# Altium PCB OpenRex_V1I1_PCB.PcbDoc (part 9 of 12)
Units mm, origin at the board's own origin, x right, y up, seen from the top; angles counter-clockwise.
Board outline 70 x 95 mm, 10 copper layers (L1, L2, L3, L4 (PWR), L5 (PWR), L6 (PWR), L7 (PWR), L8, L9, L10), stack 1.632 mm thick; 1080 components, 708 nets, 3831 pads, 2373 vias.
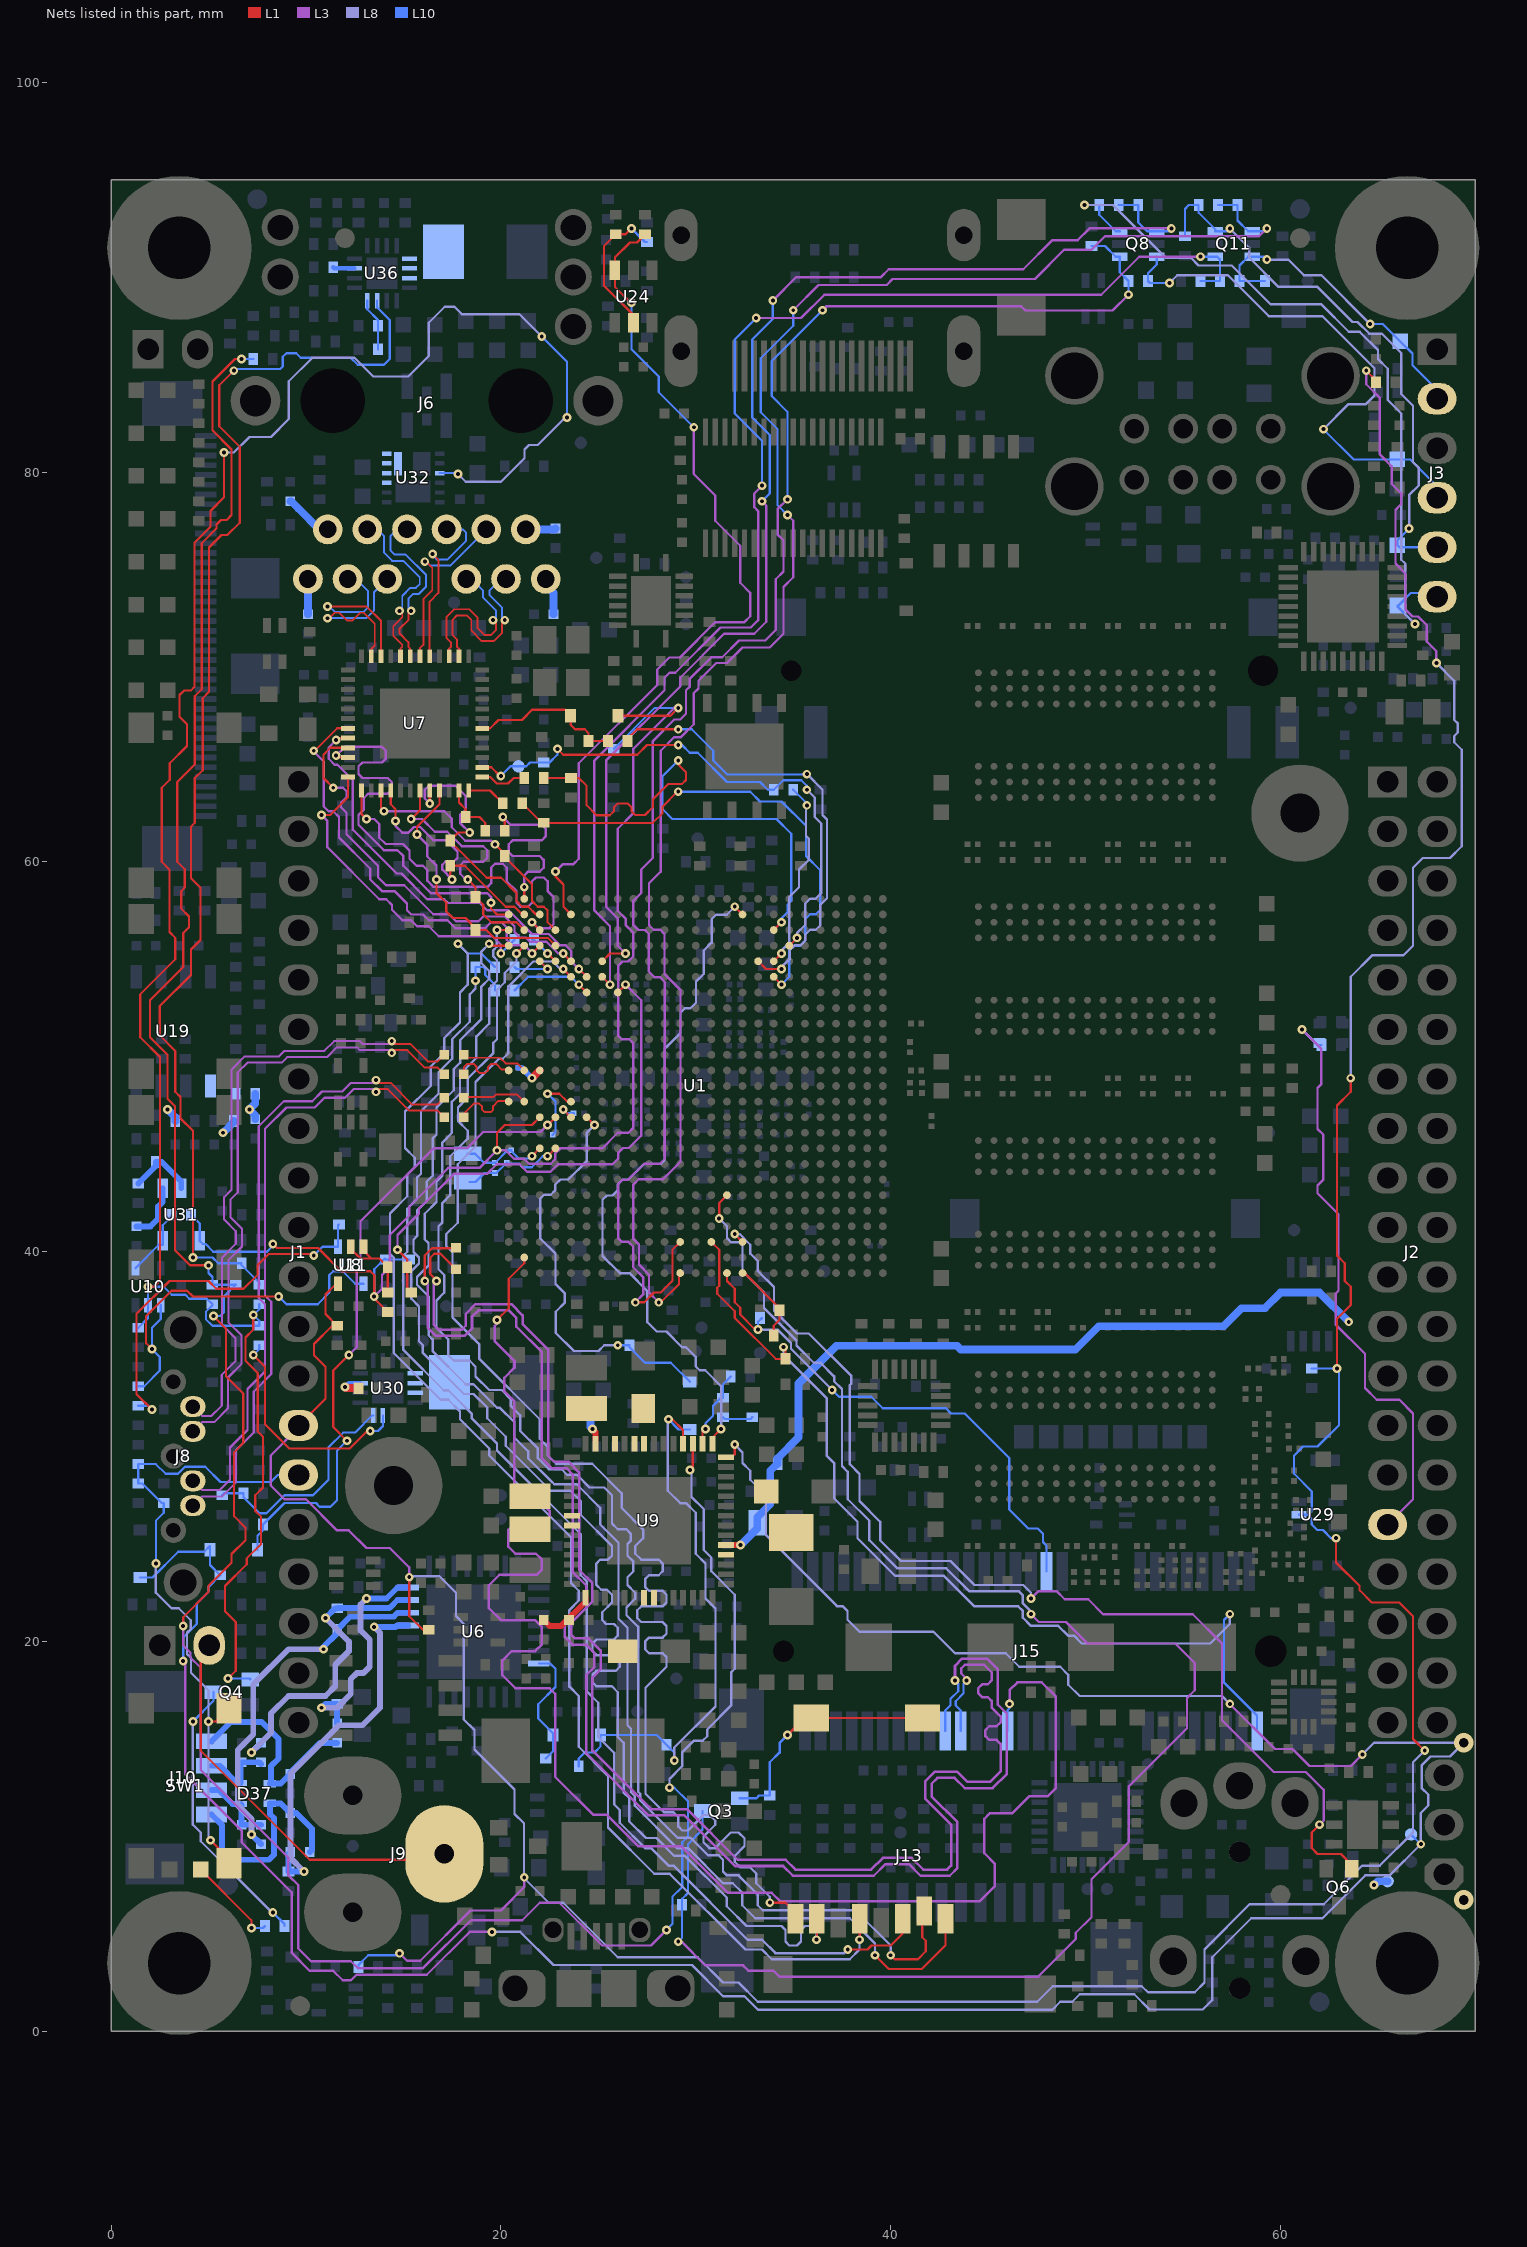
[diagram p17: the nets of this part, all layers, seen from the top]

## Via types
v1: diameter 0.45, hole 0.2, L1 to L10, tented both sides, 2369 vias
v2: diameter 1, hole 0.5, L1 to L10, tented top, 4 vias

## Nets (pads, with @x,y where several pads share a name; then routed paths per layer and width w, separated by ;. In a path a pad name is that pad's centre, name@x,y a point inside that pad or via, vN(x,y) a via of type N, cw(c..) or ccw(c..) an arc to the next point about the centre after c; other vN are vias at no path point) (continued)
PCIE_RX_P: J15.25 U1.B2 | length 83.6
  L1 w0.114: v1(19.8,36.5) 20.4,37.1 20.4,38.605 21.2,39.405 U1.B2@21.2,39.7
  L3 w0.13: v1(19.8,36.5) 19.8,36.3 19.679,36.179 19.679,35.421 20.7,34.4 20.7,34.053 20.18,33.533 20.18,32.82 20.69,32.31 20.69,27.802 21.192,27.3 21.9,27.3 22.5,26.7 22.5,26.4 22.32,26.22 20.867,26.22 20.38,25.733 20.38,24.867 20.747,24.5 21.8,24.5 22.1,24.2 22.1,23.7 21.82,23.42 19.917,23.42 19.38,22.883 19.38,21.717 19.997,21.1 21.747,21.1 22.1,20.747 22.1,19.853 21.757,19.51 20.557,19.51 20.08,19.033 20.08,18.267 20.747,17.6 22.5,17.6 22.79,17.31 22.79,13.057 24.747,11.1 25.447,11.1 27.047,9.5 29.247,9.5 31.647,7.1 33.9,7.1 34.32,6.68 44.58,6.68 45.35,7.45 45.35,8.59 44.8,9.14 44.8,10.9 45.08,11.18 46.233,11.18 47.1,12.047 48.047,12.047 48.476,12.476 48.476,17.177 47.753,17.9 46.5,17.9 46.1,17.5 v1(46.1,16.8)
  L10 w0.114: J15.25@46,15.4 46,16.49 46.1,16.59 v1(46.1,16.8)
PCIE_TX_N: C63.2 J15.31 | length 80.7
  L1 w0.114: v1(16.7,38.5) 16.7,38.525 16.374,38.851 16.374,39.687 16.583,39.896 16.904,39.896 C63.2@17.7,39.1
  L3 w0.13: v1(16.7,38.5) 16.56,38.36 16.56,36.24 16.8,36 18,36 18.2,36.2 18.2,36.8 18.71,37.31 20.543,37.31 21.12,36.733 21.12,36.28 22.42,34.98 22.42,29.528 22.738,29.21 23.49,29.21 24.02,28.68 24.02,23.68 24.7,23 24.7,22.047 23.6,20.947 23.6,20.36 23.8,20.16 24.503,20.16 25.12,19.543 25.12,18.567 24.7,18.147 24.7,14.4 27.7,11.4 29.553,11.4 32.153,8.8 34.613,8.8 35.113,8.3 39,8.3 39.6,8.9 41.072,8.9 41.672,8.3 42.9,8.3 43.1,8.5 43.1,10.6 41.78,11.92 41.78,12.833 42.267,13.32 43.413,13.32 43.933,12.8 45.1,12.8 45.64,13.34 45.64,14.75 45.44,14.95 45.057,14.95 44.857,15.15 44.857,15.45 45.057,15.65 45.44,15.65 45.64,15.85 45.64,16.16 45.18,16.62 45.18,16.95 44.98,17.15 44.69,17.15 44.49,17.35 44.49,17.6 44.69,17.8 44.98,17.8 45.18,18 45.18,18.42 44.8,18.8 43.8,18.8 43.62,18.62 43.62,18.359 43.9,18.079 v1(43.9,18)
  L10 w0.114: J15.31@43.6,15.4 43.6,16.457 43.337,16.72 43.337,16.937 43.737,17.337 43.737,17.837 v1(43.9,18)
PCIE_TX_P: C65.2 J15.33 | length 80.7
  L1 w0.114: v1(16.1,38.5) 16.1,39.8 16.47,40.17 17.67,40.17 C65.2@17.7,40.2
  L3 w0.13: v1(16.1,38.5) 16.24,38.36 16.24,36.107 16.667,35.68 18.133,35.68 18.52,36.067 18.52,36.667 18.843,36.99 20.41,36.99 20.8,36.6 20.8,36.147 22.1,34.847 22.1,29.396 22.606,28.89 23.357,28.89 23.7,28.547 23.7,23.547 24.38,22.867 24.38,22.18 23.28,21.08 23.28,20.227 23.667,19.84 24.37,19.84 24.8,19.41 24.8,18.7 24.38,18.28 24.38,14.267 27.567,11.08 29.42,11.08 32.02,8.48 34.48,8.48 34.98,7.98 39.133,7.98 39.733,8.58 40.939,8.58 41.539,7.98 43.033,7.98 43.42,8.367 43.42,10.733 42.1,12.053 42.1,12.7 42.4,13 43.281,13 43.801,12.48 45.233,12.48 45.96,13.207 45.96,16.293 45.5,16.753 45.5,18.553 44.933,19.12 43.667,19.12 43.3,18.753 v1(43.3,18)
  L10 w0.114: J15.33@42.8,15.4 42.8,16.457 43.063,16.72 43.063,17.05 43.463,17.45 43.463,17.837 v1(43.3,18)
PCIE_WAKE: J15.1 R197.1 U1.P3 | length 49.2
  L1 w0.114: U1.P3@30.8,40.5 31.2,40.1 31.2,38.244 31.1,38.144 31.1,37.844 32,36.944 32,36.6 34.1,34.5 R197.1@34.6,34.5 34.6,35 v1(34.5,35.1)
  L8 w0.12: v1(34.5,35.1) 34.5,34.7 36.715,32.485 36.715,29.541 37.1,29.156 37.1,27.344 38.3,26.144 38.3,25.3 40.234,23.366 42.734,23.366 44.3,21.8 46.544,21.8 46.785,21.559 46.785,21.215 47.2,20.8 48.6,20.8 49.1,20.3 49.4,20.3 49.8,19.9 56.4,19.9 57.4,20.9 v1(57.4,21.4)
  L10 w0.114: v1(57.4,21.4) 57.1,21.1 57.1,17.9 58.8,16.2 J15.1@58.8,15.4
PCIE_WDISN: J15.20 R116.1 U1.R1 | length 27
  L1 w0.114: U1.R1@31.6,38.9 31.6,38.5 32,38.1 32,37.4 32.28,37.12 32.28,36.776 33.056,36 v1(33.2,36)
  L8 w0.12: v1(33.2,36) 34.2,36 34.885,35.315 34.885,35.015 v1(37,32.9)
  L10 w0.114: v1(33.2,36) 33.2,36.4 R116.1@33.4,36.6 ; v1(37,32.9) 37.344,32.556 39,32.556 39.591,31.965 42.835,31.965 43.1,31.7 43.8,31.7 46.085,29.415 46.085,26.77 47.056,25.8 47.544,25.8 47.815,25.529 47.815,25.1 48,24.915 J15.20@48,23.6
PHASE_1V375: L12.1 U30.13 U30.14 U30.15
PHASE_3V3_HDR: L13.1 U36.13 U36.14 U36.15
PMIC_INT: R236.2 R263.1 U1.T24 U9.1 | length 37.8
  L1 w0.114: U9.1@30.85,30.15 30.85,30.45 v1(31.3,30.9) ; v1(32,57.7) U1.T24@32.4,57.3
  L8 w0.12: v1@31.3,31.1 31.3,33.1 30.485,33.915 30.2,33.915 30,34.115 30,34.6 29.5,35.1 29.3,35.1 28.5,35.9 28,35.9 27.515,36.385 27.515,37.985 26.6,38.9 26.1,38.9 25.215,39.785 25.215,42.659 25.441,42.885 25.729,42.885 25.985,43.141 25.985,43.429 26.241,43.685 26.529,43.685 27.344,44.5 28.2,44.5 28.4,44.7 28.4,50.4 29.215,51.215 29.215,52.259 29.441,52.485 29.729,52.485 30.015,52.771 30.015,53.859 30.408,54.252 30.408,55.448 30.815,55.855 30.815,56.7 30.815,57.059 31.041,57.285 31.585,57.285 v1(32,57.7)
  L10 w0.114: v1(31.3,30.9) 31.3,31.4 R236.2@31.4,31.5 31.485,31.415 32.815,31.415 R263.1@32.9,31.5
PMIC_ON_REQ: D29.1 R73.1 U1.D11 | length 33.5
  L1 w0.114: v1(12.1,30.3) 11.4,31 11.4,33.9 v1(12.2,34.7) ; v1(22.4,46.5) U1.D11@22.8,46.9
  L3 w0.12: v1(12.2,34.7) 12.6,35.1 12.6,39 12.8,39.2 12.8,41.556 16.544,45.3 18.256,45.3 19.096,46.14 22.04,46.14 v1(22.4,46.5)
  L10 w0.114: D29.1@7.519,24.7 7.519,25.419 7.8,25.7 R73.1@7.8,26 8.9,27.1 10.515,27.1 10.7,26.915 11.259,26.915 11.6,27.256 11.6,29.8 v1(12.1,30.3)
PMIC_SDWNB: R236.1 R264.1 U9.2 | length 4.1
  L1 w0.114: U9.2@30.35,30.15 30.35,30.75 v1(30.5,30.9)
  L10 w0.114: v1(30.5,30.9) 30.5,31.2 30.885,31.585 30.885,32.085 31.3,32.5 R236.1@31.4,32.5 31.4,33.2 R264.1@31.8,33.6
PMIC_STBY_REQ: D28.2 D36.2 R237.2 R385.1 U9.4 | length 29.5
  L1 w0.114: v1(28.6,31.4) 28.8,31.4 29.35,30.85 U9.4@29.35,30.15
  L8 w0.12: v1(28.6,31.4) 28.565,31.365 28.565,27.735 29.2,27.1 29.5,27.1 30,26.6 30,24.5 30.5,24 30.5,22.2 31.015,21.685 31.015,16.671 28.9,14.556 v1(28.9,13.9)
  L10 w0.114: R237.2@24,13.6 24,14 24.3,14.3 24.8,14.3 25.119,14.619 D36.2@25.119,15.2 28,15.2 R385.1@28.5,14.7 28.9,14.3 v1(28.9,13.9) ; v1(28.6,31.4) 29.119,30.881 D28.2@29.7,30.881
PMIC_STBY_REQ_CPU: D28.1 R266.1 U1.F11 | length 21.8
  L1 w0.114: U1.F11@24.4,46.9 v1(24.8,46.5)
  L8 w0.12: v1(24.8,46.5) 24.415,46.115 24.415,44.655 23.46,43.7 23.056,43.7 22.785,43.429 22.785,43.141 22.559,42.915 22.211,42.915 22.015,42.719 22.015,40.685 22.8,39.9 22.8,38.344 23.285,37.859 23.285,37.385 22.815,36.915 22.815,35.83 23.745,34.9 25.004,34.9 25.304,35.2 v1(26,35.2)
  L10 w0.114: v1(26,35.2) R266.1@26.6,35.2 26.6,35.1 27.4,34.3 28.719,34.3 D28.1@29.7,33.319
PMIC_VDDOTP: C376.1 R261.1 R265.2 TP17.1 U9.47 | length 42.1
  L1 w0.3: U9.47@31.55,24.95 v1(32.3,24.95)
  L1 w0.4: v2@69.35,6.75 v2@69.4,6.7
  L10 w0.4: v1(32.3,24.95) 33.15,25.8 33.15,26.366 33.82,27.036 33.82,28.76 R265.2@34.2,29.14 ; R265.2@34.2,29.1 R265.2@34.2,29.14 ; v1(63.5,36.4) 62,37.9 60,37.9 59.2,37.1 58,37.1 57.075,36.175 50.675,36.175 49.475,34.975 43.6,34.975 43.4,35.175 37.217,35.175 35.275,33.233 35.275,30.475 34.2,29.4 R265.2@34.2,29.14 ; v1(64.8,7.5) 65,7.7 TP17.1@65.5,7.7
  other v2: 69.4,6.74
PMIC_VHALF: C340.2 C342.1 U9.29 | length 3
  L1 w0.3: C342.1@22.2,21.1 22.5,20.8 23.1,20.8 24.35,22.05 U9.29@24.35,22.25
POK_1V375_OPT: R351.1 U30.3 | length 12
  L1 w0.114: v1(7.3,34.7) 7.9,34.1 7.9,31.144 9.144,29.9 12.244,29.9 13.144,30.8 v1(13.3,30.8)
  L10 w0.114: v1(7.3,34.7) 7.6,35 R351.1@7.6,35.2 ; v1(13.3,30.8) 13.7,30.8 13.95,31.05 U30.3@13.95,31.59
POK_3V3_OPT: R333.1 R405.1 U36.3 | length 65.6
  L1 w0.114: v1(4.2,39.7) 4.2,46.2 3.565,46.835 3.565,47.935 3.3,48.2 3.3,50.3 2.5,51.1 2.5,52.6 4.1,54.2 4.1,55.5 4.585,55.985 4.585,58.675 4.1,59.16 4.1,61.8 4.3,62 4.3,64.3 4.7,64.7 4.7,68.396 5.028,68.724 5.028,76.13 5.663,76.765 5.965,76.765 6.6,77.4 6.6,81.3 5.55,82.35 5.55,84.45 v1(6.3,85.2)
  L10 w0.114: v1(4.2,39.7) 5.2,39.7 5.5,39.4 R405.1@6.7,39.4 6.7,39.3 7.6,38.4 R333.1@7.6,38.3 ; v1(6.3,85.2) 6.385,85.285 8.685,85.285 8.815,85.415 8.815,85.915 9,86.1 9.5,86.1 9.733,85.867 12.289,85.867 12.656,85.5 14,85.5 14.3,85.8 14.3,87.8 13.65,88.45 U36.3@13.65,88.8
POK_PMIC: R177.1 R229.1 R404.2 U9.3 | length 145.1
  L1 w0.114: v1(3.7,20.8) 3.7,21.244 5,22.544 5,22.856 6.185,24.041 6.185,24.485 6.9,25.2 6.9,25.84 6.315,26.425 6.315,29.715 6.785,30.185 6.785,32.719 5.9,33.604 5.9,36.05 v1(5.25,36.7) ; v1(5,39.3) 4.056,39.3 3.285,40.071 3.285,47.459 2.9,47.844 2.9,50.1 2,51 2,52.9 3.7,54.6 3.7,56.344 4,56.644 4,57.2 3.6,57.6 3.6,58.494 3.785,58.679 3.785,59.615 3.4,60 3.4,64.1 4.3,65 4.3,68.5 4.657,68.857 4.657,76.351 5.415,77.109 5.415,77.309 5.641,77.535 5.929,77.535 6.185,77.791 6.185,81.159 5.2,82.144 5.2,84.644 6.356,85.8 v1(6.7,85.8) ; v1(29.7,28.8) 29.85,28.95 U9.3@29.85,30.15
  L3 w0.12: v1(3.7,20.8) 3.7,19.8 4.08,19.42 4.08,19.169 4.6,18.649 4.6,13.4 9.1,8.9 9.1,8 9.6,7.5 9.6,4.256 10.262,3.594 12.3,3.594 12.654,3.24 16.008,3.24 18.468,5.7 21.1,5.7 22,6.6 23,6.6 25.2,4.4 27.7,4.4 v1(28.5,5.2)
  L8 w0.12: v1(28.65,12.5) 28.65,12.95 29.3,13.6 29.3,14.3 29.915,14.915 30.359,14.915 30.585,15.141 30.585,15.485 31.815,16.715 31.815,18.415 32,18.6 32,22.4 30.8,23.6 30.8,24.3 30.406,24.694 30.406,26.794 29.785,27.415 29.785,28.715 v1(29.7,28.8)
  L10 w0.114: v1(5,39.3) 5,38.9 5.2,38.7 R177.1@5.2,38.3 R229.1@6.4,38.3 5.8,37.7 5.8,36.9 5.6,36.7 v1(5.25,36.7) ; v1(6.7,85.8) R404.2@7.3,85.8 ; v1(28.5,5.2) 28.8,5.5 28.8,6.9 29.304,7.404 29.304,9.7 29.6,9.996 29.6,11.8 28.9,12.5 v1(28.65,12.5)
POK_SYS: Q4.1 R177.2 R272.1 R333.2 R351.2 U10.2 U32.9 | length 115.5
  L1 w0.114: v1(1.9,38.2) 2.2,38.2 2.51,38.51 2.51,49.99 1.5,51 1.5,53.2 3.3,55 3.3,56.1 3,56.4 3,59.6 2.6,60 2.6,63.8 3.015,64.215 3.015,65.059 3.9,65.944 3.9,67.056 3.515,67.441 3.515,68.559 3.741,68.785 4.085,68.785 4.285,68.985 4.285,76.375 5.1,77.19 5.1,78 5.8,78.7 v1(5.8,81) ; v1(6,18.1) 6.4,18.5 6.4,21 5.85,21.55 5.85,22.85 6.96,23.96 6.96,24.264 7.7,25.004 7.7,26.4 7.4,26.7 7.4,27.5 7.8,27.9 7.8,30.5 7.528,30.772 7.528,33.772 6.9,34.4 6.9,35.6 7.3,36 v1(7.3,36.75)
  L8 w0.12: v1(5.8,81) 6.3,81 7.1,81.8 8.2,81.8 9.122,82.722 9.122,84.657 10.332,85.867 12.489,85.867 13.456,84.9 15.244,84.9 16.3,85.956 16.3,87.66 17.125,88.485 17.615,88.485 18,88.1 20.95,88.1 v1(22.1,86.95) ; v1(17.8,79.9) 18.2,79.5 20.008,79.5 21.215,80.707 21.215,81.159 21.441,81.385 21.893,81.385 23.308,82.8 v1(23.4,82.8)
  L10 w0.114: R272.1@1.4,36.1 1.9,36.6 U10.2@1.9,37.25 v1(1.9,38.2) 2.7,38.2 3.115,37.785 3.815,37.785 4.015,37.585 4.915,37.585 R177.2@5.2,37.3 5.2,37.256 4.865,36.921 4.865,36.535 5.2,36.2 R351.2@7.6,36.2 7.6,36.45 v1(7.3,36.75) 7.6,37.05 R333.2@7.6,37.3 ; v1(6,18.1) 7.1,18.1 Q4.1@7.15,18.05 ; U32.9@16.86,79.95 17.75,79.95 v1(17.8,79.9) ; v1(22.1,86.95) 23.4,85.65 v1(23.4,82.8)
POR_BN: D10.1 R70.1 R158.1 R178.2 R225.1 R350.1 U1.C11 U31.1 | length 71.7
  L1 w0.114: v1(8.3,40.4) 8.515,40.185 10.615,40.185 11.8,39 13.3,39 13.5,38.8 v1(13.5,37.7) 13.5,37.6 R70.1@14.2,36.9 ; v1(19.8,45.2) 19.8,46.1 20.2,46.5 21.6,46.5 U1.C11@22,46.9 ; D10.1@25.919,67.5 D10.1@25.969,67.55 ; D10.1@26.019,67.5 28.7,67.5 v1(29.1,67.9)
  L3 w0.12: v1(13.5,37.7) 13.9,38.1 13.9,38.8 14.3,39.2 14.3,40.856 15.3,41.856 15.3,42.3 17.3,44.3 18.9,44.3 v1(19.8,45.2) 20.244,45.2 20.679,44.765 21.191,44.765 21.441,44.515 22.559,44.515 22.785,44.741 22.785,45.029 23.056,45.3 25.2,45.3 26,46.1 26.544,46.1 26.785,46.341 26.785,50.7 26.585,50.9 26.2,50.9 26.015,51.085 26.015,54.659 26.241,54.885 26.529,54.885 26.8,55.156 26.8,56.36 26.4,56.76 26.4,57.096 26,57.496 26,61.7 26.8,62.5 26.8,65.8 28.9,67.9 v1(29.1,67.9)
  L10 w0.114: R350.1@4.1,41.9 4.55,41.45 U31.1@4.55,40.55 4.7,40.4 4.844,40.4 5.244,40 8,40 8.3,40.3 v1(8.3,40.4) ; v1(13.5,37.7) 13.5,39.1 R158.1@14.05,39.65 ; R158.1@14.1,39.6 R225.1@15.3,39.6 ; R178.2@25.8,65.8 27.9,67.9 v1(29.1,67.9)
POR_CT: C413.1 U31.4 | length 2.9
  L10 w0.3: C413.1@1.3,41.3 2.021,41.3 2.41,41.689 2.41,42.31 2.65,42.55 U31.4@2.65,43.25
POR_R_BN: R350.2 U10.4 U31.3 | length 3.6
  L10 w0.114: U10.4@1.25,39.15 2.45,40.35 2.65,40.35 U31.3@2.65,40.55 2.65,41.35 3.1,41.8 R350.2@3.1,41.9
PWM2_OUT_R: J2.31 R367.2 R369.2 | length 30.8
  L3 w0.12: v1(61.1,51.4) 62.1,50.4 62.1,48.6 61.9,48.4 61.9,46.3 62.2,46 62.2,43.7 61.9,43.4 61.9,43 62.98,41.92 62.98,37.995 62.83,37.845 62.83,36.27 64.34,34.76 64.34,33 64.94,32.4 66.1,32.4 66.8,31.7 66.8,27.3 J2.31@65.5,26
  L10 w0.114: v1(61.1,51.4) 61.9,50.6 R367.2@62.1,50.6
PWR_LED_GRN_D: D22.1 R379.1 | length 4.8
  L1 w0.114: D22.1@4.6,8.3 7.2,5.7 v1(7.2,5.3)
  L10 w0.114: v1(7.2,5.3) 7.8,5.3 R379.1@7.9,5.4
PWR_LED_GRN_Q: Q4.3 R379.2 | length 14.4
  L8 w0.12: v1(4.2,15.9) 4.2,10.6 4.6,10.2 4.6,9.756 8.256,6.1 v1(8.3,6.1)
  L10 w0.114: v1(4.2,15.9) 5.25,16.95 Q4.3@5.25,17.4 ; v1(8.3,6.1) 8.9,5.5 R379.2@8.9,5.4
PWR_SEL: J9.3 JP1.2 | length 20.5
  L1 w0.114: JP1.2@5.04,19.78 5.04,19.6 4.6,19.16 4.6,14.4 10.2,8.8 16.1,8.8 16.4,9.1 J9.3@17.1,9.1
PWRON: D29.2 D39.2 R262.1 TP6.1 U9.56 | length 150.9
  L1 w0.114: U9.56@31.55,29.45 31.85,29.45 32,29.6 v1(32,30.1)
  L3 w0.12: v1(3.7,19) 3.8,18.9 3.8,13.2 6.7,10.3 6.7,9.7 9.265,7.135 9.265,4.035 10.2,3.1 11.4,3.1 11.885,2.615 12.315,2.615 12.6,2.9 16.2,2.9 18.4,5.1 v1(19.55,5.1) ; v1(57.4,16.8) 59.715,14.485 60.615,14.485 61.485,13.615 63.615,13.615 v1(64.2,14.2)
  L8 w0.12: v1(19.55,5.1) 21,5.1 22.7,3.4 29.8,3.4 31.398,1.802 32.502,1.802 33.204,1.1 48.285,1.1 48.7,1.515 49.315,1.515 49.7,1.9 52.5,1.9 53.285,1.115 56.015,1.115 56.5,1.6 56.5,3.8 58.5,5.8 62.15,5.8 64.35,8 65.6,8 v1(67.2,9.6) 67.2,11.2 67.585,11.585 67.585,12.144 67.24,12.489 67.24,13.64 67.7,14.1 68.7,14.1 v2(69.4,14.8) 64.8,14.8 v1(64.2,14.2) ; v1(32,30.1) 32.4,29.7 32.4,29.156 32.8,28.756 32.8,28.3 33.6,27.5 33.6,25.456 37.241,21.815 37.529,21.815 37.785,21.559 37.785,21.115 38.4,20.5 42.2,20.5 43.3,19.4 45.9,19.4 46.6,18.7 48.7,18.7 49.115,18.285 49.115,17.785 49.7,17.2 57,17.2 v1(57.4,16.8)
  L10 w0.114: D39.2@1.5,23.281 2.125,23.281 3.444,24.6 4.781,24.6 5.081,24.9 D29.2@5.081,24.7 5.081,23.919 R262.1@5.6,23.4 5,22.8 5,22.544 4.4,21.944 4.4,20.9 3.7,20.2 v1(3.7,19) ; TP6.1@66.7,10.1 v1(67.2,9.6)
RGMII_INT: R88.2 R89.1 TP27.1 U1.W22 U7.38 | length 28.6
  L1 w0.114: U7.38@19.04,64.85 19.506,64.85 19.956,64.4 v1(20,64.4) ; v1(22.9,65.8) 23.2,65.5 27,65.5 27.5,66 v1(29.1,66) ; U1.W22@34.8,55.7 v1(35.2,56.1)
  L8 w0.12: v1(35.2,56.1) 35.2,56.356 35.615,56.771 35.615,57.2 35.615,57.859 35.871,58.115 36.159,58.115 36.44,58.396 36.44,61.96 36.1,62.3 36.1,63.3 v1(35.7,63.7)
  L10 w0.114: v1(20,64.4) 20.5,64.9 TP27.1@20.9,64.9 21.3,64.9 21.5,65.1 R89.1@22.2,65.1 22.5,65.1 22.9,65.5 v1(22.9,65.8) ; v1(29.1,66) 29.296,66 29.696,65.6 30.1,65.6 31.6,64.1 33.3,64.1 33.7,63.7 R88.2@34,63.7 34.49,64.19 35.41,64.19 35.7,63.9 v1(35.7,63.7)
RGMII_INT_R: R88.1 U1.V21 | length 9.9
  L1 w0.114: U1.V21@34,54.9 v1(34.4,55.3)
  L8 w0.12: v1(34.4,55.3) 34.4,55.455 34.8,55.855 34.8,58.2 35.3,58.7 35.3,59.6 35.8,60.1 35.8,61.194 35.653,61.341 35.653,62.853 v1(35.7,62.9)
  L10 w0.114: R88.1@35,63.7 35.7,63 v1(35.7,62.9)
RGMII_MDC: R85.1 R87.1 U1.V20 | length 26.7
  L1 w0.114: R85.1@21.1,63 22.1,62 R87.1@22.2,62 27.8,62 28.3,62.5 28.3,62.844 29.056,63.6 v1(29.1,63.6) ; U1.V20@34,54.1 v1(34.4,53.7)
  L10 w0.114: v1(29.1,63.6) 32.8,63.6 33.3,63.1 34.4,63.1 35.653,61.847 35.653,60.302 36.385,59.571 36.385,57.541 36.159,57.315 35.871,57.315 35.615,57.059 35.615,55.971 35.329,55.685 35.041,55.685 34.8,55.444 34.8,54.1 v1(34.4,53.7)
RGMII_MDIO: R86.1 R162.1 U1.V23 | length 26.8
  L1 w0.114: R86.1@22.2,64.3 R162.1@23.6,64.3 24,64.3 24.4,63.9 24.4,62.9 24.91,62.39 25.59,62.39 25.8,62.6 25.8,62.8 26,63 26.5,63 26.7,62.8 26.7,62.6 26.9,62.4 27.4,62.4 27.8,62.8 27.8,63.2 28.6,64 29.3,64 29.5,64.2 29.5,64.6 29.1,65 v1(29.1,65.2) ; U1.V23@34,56.5 v1(34.4,56.9)
  L10 w0.114: v1(29.1,65.2) 28.3,64.4 28.3,62.7 28.8,62.2 34.144,62.2 34.9,61.444 34.9,58 34.7,57.8 34.7,57.4 34.4,57.1 v1(34.4,56.9)
RGMII_R_MDC: R85.2 U7.36 | length 2
  L1 w0.114: U7.36@18.35,63.66 19.44,63.66 R85.2@20.1,63
RGMII_R_MDIO: R86.2 U7.37 | length 2.4
  L1 w0.114: U7.37@19.04,64.35 19.45,64.35 19.785,64.015 20.371,64.015 20.656,64.3 R86.2@21.2,64.3
RGMII_R_RXCLK: R83.2 R101.2 U7.35 | length 3
  L1 w0.114: U7.35@17.85,63.66 17.85,63.05 18.2,62.7 R101.2@18.2,62.3 18.9,62.3 19.2,62 R83.2@19.2,61.6
RGMII_R_TXCLK: R35.1 U1.D21 | length 1.7
  L1 w0.114: v1(22.4,55.3) U1.D21@22.8,54.9
  L10 w0.114: R35.1@21.6,56 R35.1@21.7,56 v1(22.4,55.3)
RGMII_RSTN: D10.2 R75.1 R180.1 U7.42 | length 8.1
  L1 w0.114: U7.42@19.04,66.85 19.45,66.85 19.88,67.28 21.08,67.28 21.6,67.8 23.281,67.8 D10.2@23.581,67.5 23.581,67.019 23.8,66.8 24.3,66.8 24.5,66.6 R75.1@24.5,66.2 25.4,66.2 R180.1@25.5,66.1
RGMII_RSTN_R: R180.2 U1.U21 | length 23.9
  L1 w0.114: R180.2@26.4,66.2 27,66.8 v1(29.1,66.8) ; U1.U21@33.2,54.9 33.6,54.5 v1(34.4,54.5)
  L8 w0.12: v1(34.4,54.5) 34.4,54.6 34.815,55.015 34.815,55.459 35.071,55.715 35.359,55.715 35.615,55.971 35.615,56.259 35.871,56.515 36.159,56.515 36.385,56.741 36.385,57.785 36.73,58.13 36.73,62.17 36.5,62.4 36.5,63.7 v1(35.7,64.5)
  L10 w0.114: v1(29.1,66.8) 29.8,66.8 30.9,65.7 30.9,65.2 31.62,64.48 35.68,64.48 v1(35.7,64.5)
RGMII_RXCLK: R83.1 U1.B25 | length 10.8
  L1 w0.114: v1(20.1,62.3) 20.2,62.2 R83.1@20.2,61.6 ; U1.B25@21.2,58.1 v1(21.2,58.7)
  L3 w0.12: v1(20.1,62.3) 20.5,61.9 22.095,61.9 22.295,61.7 22.295,61.3 22.095,61.1 20.605,61.1 20.405,60.9 20.405,60.5 20.605,60.3 22,60.3 ; v1(21.2,58.7) 21.2,59.3 21.4,59.5 21.995,59.5 22.195,59.7 22.195,60.1 21.995,60.3
RGMII_RXD0: R98.1 U1.C24 U7.32 | length 13.7
  L1 w0.114: v1(16.35,63) U7.32@16.35,63.66 ; v1(18.4,61.5) 17.8,61.5 R98.1@17.4,61.1 17.4,61.056 19.27,59.186 20.014,59.186 20.8,58.4 20.8,57.991 21.091,57.7 21.4,57.7 21.8,57.3 U1.C24@22,57.3
  L3 w0.12: v1(16.35,63) 16.1,63.25 16.1,63.7 16.3,63.9 17.675,63.9 18.2,63.375 18.2,62.7 17.9,62.4 17.9,62 v1(18.4,61.5)
RGMII_RXD1: R97.1 U1.B23 U7.31 | length 13.6
  L1 w0.114: v1(15.4,62.2) 15.85,62.65 U7.31@15.85,63.66 ; v1(18.3,59.1) 18.7,58.7 R97.1@18.7,58.2 19.1,57.8 19.1,57.3 19.5,56.9 20.8,56.9 U1.B23@21.2,56.5
  L3 w0.12: v1(15.4,62.2) 15.956,62.2 16.61,61.545 17.255,61.545 18,60.8 19.1,60.8 19.3,60.6 19.3,60.2 19.1,60 18.1,60 17.915,59.815 17.915,59.385 18.2,59.1 v1(18.3,59.1)
RGMII_RXD2: R96.1 U1.B24 U7.28 | length 13.7
  L1 w0.114: U7.28@14.35,63.66 14.35,62.95 14.6,62.7 v1(14.6,62.1) ; v1(17.5,59.1) 17.4,59.2 R96.1@17.4,59.8 18.144,59.8 20.244,57.7 20.695,57.7 21.095,57.3 U1.B24@21.2,57.3
  L3 w0.12: v1(14.6,62.1) 14.6,61.844 14.944,61.5 15.256,61.5 15.541,61.785 15.859,61.785 16.529,61.115 17.185,61.115 17.775,60.525 17.775,60.2 17.575,60 17.15,60 17,59.85 17,59.6 v1(17.5,59.1)
RGMII_RXD3: R95.1 U1.D23 U7.27 | length 13.7
  L1 w0.114: U7.27@13.85,63.66 13.85,62.75 v1(14,62.6) ; v1(19.7,60.9) 20.2,60.4 R95.1@20.2,60.3 20.2,60.244 21.6,58.844 21.6,57.991 21.891,57.7 22.2,57.7 22.4,57.5 22.4,56.9 U1.D23@22.8,56.5
  L3 w0.12: v1(14,62.6) 17.1,62.6 17.478,62.222 17.478,61.778 18.176,61.08 19.52,61.08 v1(19.7,60.9)
RGMII_RXDV: R91.1 U1.D22 U7.33 | length 13.7
  L1 w0.114: v1(15.7,61.4) 15.7,61.8 16.85,62.95 U7.33@16.85,63.66 ; v1(16.7,59.1) 16.7,58.4 17.2,57.9 17.2,57.456 17.541,57.115 18.185,57.115 18.7,56.6 R91.1@18.7,56.5 19.244,56.5 19.644,56.1 22.4,56.1 U1.D22@22.8,55.7
  L3 w0.12: v1(15.7,61.4) 16.215,60.885 16.215,60.291 16.7,59.806 v1(16.7,59.1)
RGMII_TXCLK: R35.2 U7.24 | length 17.1
  L1 w0.114: v1(10.8,62.4) 11.244,62.4 12.16,63.316 U7.24@12.16,64.35
  L3 w0.12: v1(10.8,62.4) 11.1,62.1 11.1,60.744 13.759,58.085 14.115,58.085 14.415,57.785 14.415,57.541 14.948,57.007 15.393,57.007 15.7,56.7 16.3,56.7 16.815,56.185 19.559,56.185 20,55.744 v1(20,55.3)
  L10 w0.114: v1(20,55.3) R35.2@20.7,56
RGMII_TXD0: U1.C22 U7.19 | length 21.5
  L1 w0.114: v1(10.4,65.7) 10.456,65.7 11.606,66.85 U7.19@12.16,66.85 ; v1(21.6,55.3) U1.C22@22,55.7
  L3 w0.12: v1(10.4,65.7) 10.4,65.66 10.915,65.145 10.915,62.841 11.156,62.6 11.4,62.6 11.696,62.304 11.696,61.248 13.3,59.644 13.3,59.1 13.9,58.5 14.544,58.5 15.185,57.859 15.185,57.515 15.4,57.3 16,57.3 16.3,57 17.26,57 17.66,56.6 19.2,56.6 19.5,56.9 20.027,56.9 20.3,56.627 20.3,56 20.573,55.727 21.2,55.727 21.6,55.327 v1(21.6,55.3)
RGMII_TXD1: U1.F20 U7.20 | length 21.5
  L1 w0.114: v1(11.55,66.25) 11.65,66.35 U7.20@12.16,66.35 ; v1(24,54.5) U1.F20@24.4,54.1
  L3 w0.12: v1(11.55,66.25) 11.165,65.865 11.165,65.291 11.471,64.985 11.615,64.985 12.4,64.2 12.4,61.656 14.656,59.4 14.9,59.4 16.215,58.085 17.1,58.085 17.3,57.885 18.915,57.885 19.285,57.515 20.385,57.515 21.6,56.3 22.456,56.3 23.041,55.715 23.329,55.715 23.615,55.429 23.615,54.885 v1(24,54.5)
RGMII_TXD2: U1.E21 U7.21 | length 21.5
  L1 w0.114: v1(11.4,63.8) 10.9,64.3 10.9,65.5 11.25,65.85 U7.21@12.16,65.85 ; v1(23.2,55.3) U1.E21@23.6,54.9
  L3 w0.12: v1(11.4,63.8) 11.9,63.8 12.08,63.62 12.08,63.3 11.8,63.02 11.8,62.8 12.08,62.52 12.08,61.42 13.7,59.8 13.7,59.206 14.106,58.8 15.044,58.8 16.529,57.315 17.341,57.315 17.706,56.95 18.85,56.95 19.1,57.2 20.2,57.2 20.7,56.7 20.7,56.4 21,56.1 21.3,56.1 21.5,55.9 22.344,55.9 22.944,55.3 v1(23.2,55.3)
RGMII_TXD3: U1.A24 U7.22 | length 21.4
  L1 w0.114: v1(11.55,65.45) 11.65,65.35 U7.22@12.16,65.35 ; v1(19.5,57.9) 19.5,57.6 19.8,57.3 U1.A24@20.4,57.3
  L3 w0.12: v1(11.55,65.45) 12,65.9 13.9,65.9 14.1,65.7 14.1,65.3 13.9,65.1 12.9,65.1 12.7,64.9 12.7,64.5 12.9,64.3 14.2,64.3 14.4,64.1 14.4,63.7 14.2,63.5 13.2,63.5 12.965,63.265 12.965,62.665 12.7,62.4 12.7,61.9 14,60.6 14.7,60.6 15,60.3 15,59.8 16.415,58.385 19.315,58.385 19.5,58.2 v1(19.5,57.9)
RGMII_TXEN: U1.C23 U7.25 | length 21.5
  L1 w0.114: U7.25@12.85,63.66 12.85,62.45 v1(13.1,62.2) ; v1(21.6,56.9) U1.C23@22,56.5
  L3 w0.12: v1(13.1,62.2) 13.5,62.2 13.765,61.935 13.765,61.241 14.091,60.915 14.985,60.915 15.315,60.585 15.315,60.16 15.675,59.8 16,59.8 16.22,59.58 16.22,59.036 16.541,58.715 19.315,58.715 19.5,58.9 19.5,59.7 19.7,59.9 20.1,59.9 20.3,59.7 20.3,59 20.8,58.5 20.8,57.9 21,57.7 21.4,57.7 21.6,57.9 21.6,59 21.8,59.2 22.2,59.2 22.4,59 22.4,58.5 22.7,58.2 22.7,56.8 22.5,56.6 21.9,56.6 v1(21.6,56.9)
RST_BTN_HDR: J1.15 R140.1 R141.2 R347.1 SW1.1 SW1.2 | length 33.7
  L1 w0.114: v1(5,15.9) 5.375,15.9 SW1.1@6.05,16.575 ; v1(5.1,9.8) 6.05,8.85 SW1.2@6.05,8.625
  L8 w0.12: v1(2.3,24) 2.3,22.5 3.1,21.7 3.47,21.7 4.085,21.085 4.085,20.641 3.9,20.456 3.9,19.362 4.1,19.162 4.1,18.4 5,17.5 v1(5,15.9) 5,9.9 v1(5.1,9.8)
  L10 w0.114: v1(2.3,24) 2.3,26.2 2.7,26.6 R140.1@2.7,27.1 2.6,27.1 1.6,28.1 R347.1@1.4,28.1 R141.2@1.4,29.1 2.3,29.1 2.8,28.6 3.436,28.6 3.8,28.964 4.836,28.964 5.62,28.18 8.2,28.18 8.56,28.54 J1.15@9.62,28.54
RSTINN: R68.1 R348.2 U8.1 | length 19.7
  L1 w0.114: v1(2.1,31.9) 1.3,32.7 1.3,36.8 3,38.5 5,38.5 5.4,38.1 6.8,38.1 7.52,38.82 7.52,39.32 8.085,39.885 10.315,39.885 v1(10.4,39.8)
  L10 w0.114: R348.2@1.4,32.1 1.9,32.1 v1(2.1,31.9) ; v1(10.4,39.8) 10.85,40.25 U8.1@11.65,40.25 11.65,41.35 R68.1@11.7,41.4
RSTINN_BUFF: R59.1 U8.4 U10.1 | length 20.5
  L1 w0.114: v1(2.1,35) 1.8,35.3 1.8,36.7 3.1,38 3.9,38 4.2,37.7 v1(8.6,37.7)
  L10 w0.114: R59.1@1.4,33.1 1.7,33.1 2.5,33.9 2.5,34.6 v1(2.1,35) 2.1,36.1 2.55,36.55 U10.1@2.55,37.25 ; v1(8.6,37.7) 9,37.3 10.6,37.3 11.2,37.9 11.2,38.8 11.4,39 11.882,39 12.532,38.35 U8.4@12.95,38.35 ; v1@8.6,37.8 v1@8.65,37.75
RSTOUTN: J1.14 R144.2 R155.2 R218.2 R281.2 R318.1 U11.4 U29.2 | length 199.5
  L1 w0.114: J1.14@9.62,31.08 11,32.46 11,34.1 10.415,34.685 10.415,35.259 11.356,36.2 R144.2@11.6,36.2 11,36.8 11,37.8 11.55,38.35 U11.4@11.65,38.35 ; v1(15.3,23.3) 15.3,21.3 16,20.6 R281.2@16.3,20.6 ; v1(62.85,25.3) 62.85,24.054 64.06,22.844 64.06,22.625 64.685,22 66.1,22 66.8,21.3 66.8,15 v1(67.4,14.4) ; v1(62.9,34) 62.9,36.565 63.6,37.265 63.6,38.2 63.3,38.5 63.3,39.4 62.9,39.8 62.9,47.5 63.6,48.2 v1(63.6,48.9) ; v1(64.4,85.2) 64.9,84.7 R218.2@64.9,84.6
  L3 w0.12: J1.14@9.62,31.08 9.62,30.976 8.19,29.546 8.19,28.01 8.9,27.3 10,27.3 11.6,25.7 12.2,25.7 13.1,24.8 14.3,24.8 15.3,23.8 v1(15.3,23.3) ; v1(14.8,4) 15.185,3.615 15.859,3.615 18.444,6.2 20,6.2 21.2,7.4 v1(21.2,7.9) ; v1(64.4,85.2) 64.4,84.5 65.1,83.8 65.1,80.9 65.7,80.3 65.7,79.4 66.2,78.9 66.2,78.356 65.9,78.056 65.9,75.3 66.415,74.785 66.415,72.941 66.771,72.585 67.059,72.585 67.5,72.144 67.5,71.3 68,70.8 v1(68,70.2)
  L8 w0.12: v1(15.3,23.3) 15.345,23.345 16.855,23.345 17.7,22.5 17.7,21.3 18.1,20.9 18.1,16 18.647,15.453 18.647,14.453 20.7,12.4 20.7,11.156 21.185,10.671 21.185,7.915 v1(21.2,7.9) 21.2,7.856 22.456,6.6 23.2,6.6 26,3.8 30.1,3.8 31.4,2.5 32.2,2.5 33.18,1.52 47.52,1.52 48.315,2.315 52.885,2.315 53.2,2 55.6,2 56.1,2.5 56.1,4.2 58.415,6.515 62.215,6.515 64.2,8.5 65.096,8.5 66.8,10.204 66.8,13.8 v1(67.4,14.4) ; v1(63.6,48.9) 63.6,54.1 64.7,55.2 66.3,55.2 66.8,55.7 66.8,59.7 67.3,60.2 68.7,60.2 69.3,60.8 69.3,65.756 68.915,66.141 68.915,66.459 69.1,66.644 69.1,67.1 68.915,67.285 68.915,69.285 v1(68,70.2)
  L10 w0.114: R155.2@12.7,3.3 12.7,3.4 13.2,3.9 14.7,3.9 v1(14.8,4) ; U29.2@60.95,26.5 61.4,26.5 ; R318.1@61.6,34 v1(62.9,34) 63,33.9 63,31.1 61.9,30 61.156,30 60.7,29.544 60.7,28.6 61.6,27.7 61.6,26.7 61.4,26.5 ; v1(62.85,25.3) 62.594,25.3 62.179,25.715 61.891,25.715 61.6,26.006 61.6,26.3 61.4,26.5
RSTOUTN_BUFF: R51.2 R70.2 U11.1 U11.2 | length 4.5
  L1 w0.114: U11.2@12.3,40.25 12.3,40.144 12.8,39.644 13.356,39.644 ; U11.1@12.95,40.25 12.95,40.05 13.356,39.644 ; R70.2@14.2,37.9 R51.2@14.2,39.2 13.756,39.644 13.356,39.644
RSTOUTN_R: R49.1 R51.1 U1.H19 | length 27.1
  L1 w0.114: v1(14.7,40.1) 15.2,39.6 R51.1@15.2,39.2 15.2,38.1 R49.1@15.4,37.9 ; U1.H19@26,53.3 v1(26.4,53.7)
  L3 w0.12: v1(14.7,40.1) 14.7,40.86 15.8,41.96 15.8,42.2 17.59,43.99 19.29,43.99 19.785,44.485 20.962,44.485 21.347,44.1 22.54,44.1 22.925,44.485 25.729,44.485 26.015,44.771 26.015,45.059 26.271,45.315 26.559,45.315 27.2,45.956 27.2,52.9 v1(26.4,53.7)
RTC_XTALI: C211.1 R168.1 U1.D9 Y2.1 | length 5.3
  L1 w0.114: v1(22.4,44.9) U1.D9@22.8,45.3
  L10 w0.114: Y2.1@18.4,43.575 18.7,43.575 19.16,44.035 R168.1@19.7,44.035 19.77,44.035 C211.1@20.3,44.565 20.36,44.505 20.939,44.505 21.109,44.335 21.579,44.335 22.144,44.9 v1(22.4,44.9)
RTC_XTALO: C212.1 R168.2 U1.C9 Y2.2 | length 4.6
  L1 w0.114: v1(21.6,44.9) U1.C9@22,45.3
  L10 w0.114: Y2.2@18.3,45.025 18.675,45.025 19.135,44.565 R168.2@19.7,44.565 19.709,44.565 20.344,45.2 C212.1@20.535,45.2 20.535,45.165 20.915,44.785 21.485,44.785 v1(21.6,44.9)
SATA_C_RX_N: C69.1 U1.A14 | length 3.4
  L1 w0.1: C69.1@18.1,49.1 18.1,49.45 18.28,49.63 18.6,49.63 18.75,49.48 18.75,49.317 18.9,49.168 19.2,49.168 19.35,49.317 19.35,49.48 19.5,49.63 19.761,49.63 20.051,49.34 20.36,49.34 U1.A14@20.4,49.3
SATA_C_RX_P: C70.1 U1.B14 | length 3.4
  L1 w0.1: C70.1@18.1,50.1 18.25,49.95 19.95,49.95 20.24,49.66 20.84,49.66 U1.B14@21.2,49.3
SATA_C_TX_N: C71.1 U1.B12 | length 3.3
  L1 w0.1: C71.1@18.1,47.9 18.1,47.932 19.615,47.932 19.742,48.06 20.84,48.06 U1.B12@21.2,47.7
SATA_C_TX_P: C72.1 U1.A12 | length 3.3
  L1 w0.1: C72.1@18.1,46.9 18.1,47.075 18.637,47.612 18.875,47.612 19.025,47.462 19.025,47.313 19.175,47.163 19.475,47.163 19.605,47.293 19.605,47.47 19.875,47.74 20.36,47.74 U1.A12@20.4,47.7
SATA_REXT: R99.2 U1.C14 | length 1.5
  L1 w0.4: v1(21.6,48.9) U1.C14@22,49.3
  L10 w0.3: R99.2@20.9,49.435 21.065,49.435 v1(21.6,48.9)
SATA_RX_N: C69.2 J8.5 | length 32.6
  L1 w0.1: v1(14.4,50.2) 14.54,50.34 15.207,50.34 16.107,49.44 16.76,49.44 C69.2@17.1,49.1
  L3 w0.11: J8.5@4.2,30.78 4.675,31.255 5.288,31.255 6,31.967 6,33.547 6.7,34.247 6.7,35.7 6.02,36.38 6.02,39.567 6.72,40.267 6.72,41.18 6.12,41.78 6.12,42.667 6.5,43.047 6.5,49.2 7,49.7 8.753,49.7 9.033,49.98 11.08,49.98 11.58,50.48 12.627,50.48 12.767,50.34 14.26,50.34 v1(14.4,50.2)
SATA_RX_P: C70.2 J8.6 | length 32.6
  L1 w0.1: v1(14.4,50.8) 14.54,50.66 15.34,50.66 16.24,49.76 16.76,49.76 C70.2@17.1,50.1
  L3 w0.11: J8.6@4.2,32.05 4.675,31.575 5.155,31.575 5.68,32.1 5.68,33.68 6.38,34.38 6.38,35.567 5.7,36.247 5.7,39.7 6.4,40.4 6.4,41.047 5.8,41.647 5.8,42.8 6.18,43.18 6.18,49.333 6.867,50.02 8.62,50.02 8.9,50.3 10.947,50.3 11.447,50.8 12.76,50.8 12.9,50.66 14.26,50.66 v1(14.4,50.8)
SATA_TX_N: C71.2 J8.3 | length 32.5
  L1 w0.1: v1(13.6,48.8) 13.74,48.66 14.34,48.66 15.44,47.56 16.76,47.56 C71.2@17.1,47.9
  L3 w0.11: J8.3@4.2,28.24 4.675,27.765 5.565,27.765 6.1,28.3 6.1,29.953 7,30.853 7,32.953 7.9,33.853 7.9,37.3 7.58,37.62 7.58,46.433 8.867,47.72 10.32,47.72 10.82,48.22 11.867,48.22 12.307,48.66 13.46,48.66 v1(13.6,48.8)
SATA_TX_P: C72.2 J8.2 | length 32.5
  L1 w0.1: v1(13.6,48.2) 13.74,48.34 14.207,48.34 15.307,47.24 16.76,47.24 C72.2@17.1,46.9
  L3 w0.11: J8.2@4.2,26.97 4.675,27.445 5.698,27.445 6.42,28.167 6.42,29.82 7.32,30.72 7.32,32.82 8.22,33.72 8.22,37.433 7.9,37.753 7.9,46.3 9,47.4 10.453,47.4 10.953,47.9 12,47.9 12.44,48.34 13.46,48.34 v1(13.6,48.2)
SD2_ACT: Q6.1 U1.T3 | length 56.6
  L1 w0.114: v1(32,40.9) U1.T3@32.4,40.5 ; v1(62,10.6) 61.6,10.2 61.6,9.4 61.9,9.1 63.1,9.1 63.65,8.55 Q6.1@63.65,8.35
  L3 w0.12: v1(47.2,22.2) 47.585,22.585 48.515,22.585 48.935,22.165 50.135,22.165 50.9,21.4 55.5,21.4 57,19.9 57,15.956 59.656,13.3 61.3,13.3 62.215,12.385 62.215,10.815 v1(62,10.6)
  L8 w0.12: v1(32,40.9) 32.256,40.9 32.8,40.356 32.8,39.9 33.185,39.515 33.185,39.015 34.015,38.185 34.015,36.985 35.2,35.8 35.8,35.8 37.985,33.615 37.985,33.241 37.9,33.156 37.9,29.1 38.4,28.6 38.4,27.2 39.46,26.14 39.46,25.196 40.524,24.132 43.068,24.132 44.3,22.9 46.8,22.9 47.2,22.5 v1(47.2,22.2)
SD2_CD: Q3.3 R150.1 U1.R6 | length 87
  L1 w0.114: v1(31.2,41.7) 31.2,42.5 U1.R6@31.6,42.9
  L3 w0.12: v1(29.1,4.6) 29.264,4.6 30.482,3.382 32.428,3.382 32.7,3.11 33.99,3.11 34.3,2.8 47.566,2.8 49.5,4.734 49.5,5.056 50.3,5.856 50.3,7.8 52.223,9.723 52.223,12.567 55.2,15.544 55.2,17.1 55.6,17.5 55.6,18.9 54.6,19.9 50.1,19.9 49,21 47.6,21 v1(47.2,21.4)
  L8 w0.12: v1(31.2,41.7) 31.6,41.3 31.6,40.7 31.815,40.485 32.215,40.485 32.4,40.3 32.4,39 33.5,37.9 33.5,37.104 35.165,35.439 35.165,35.191 36.056,34.3 36.4,34.3 37.1,33.6 37.1,33.356 37.5,32.956 37.5,29 37.8,28.7 37.8,27.3 38.9,26.2 38.9,25.2 40.351,23.749 42.851,23.749 44.015,22.585 46.559,22.585 46.785,22.359 46.785,21.955 47.2,21.54 v1(47.2,21.4)
  L10 w0.114: v1(29.1,4.6) 29.3,4.8 R150.1@29.3,6.5 29.3,6.8 29.6,7.1 29.6,9.6 30.35,10.35 Q3.3@30.35,11.3
SD2_CDN: J13.9 J13.10 Q3.1 R201.1 | length 12.4
  L1 w0.123: v1(34.7,15.2) 35.575,16.075 J13.10@35.925,16.075 J13.9@41.625,16.075
  L10 w0.123: Q3.1@32.25,11.95 33.1,11.95 33.25,12.1 R201.1@33.8,12.1 33.8,13.8 34.3,14.3 34.3,14.8 v1(34.7,15.2)
SD2_CLK: J13.5 R153.2 | length 72.8
  L1 w0.114: v1(38.4,4.7) 38.415,4.715 J13.5@38.415,5.775
  L8 w0.12: v1(17.8,55.8) 18.3,55.3 18.3,53.7 17.9,53.3 17.9,51.756 17.1,50.956 17.1,50.2 16.4,49.5 16.4,48.5 15.085,47.185 15.085,45.315 15.585,44.815 15.585,44.341 15.2,43.956 15.2,42.844 14.315,41.959 14.315,39.885 14.5,39.7 14.5,34.8 16.9,32.4 17.3,32.4 17.9,31.8 17.9,31.4 19.4,29.9 19.4,29.544 23.6,25.344 23.6,23 24,22.6 24,22.1 23.515,21.615 23.515,17.685 24,17.2 24,14.6 25.5,13.1 25.5,10.456 27.871,8.085 28.659,8.085 32.544,4.2 33.4,4.2 33.9,3.7 37.9,3.7 38.4,4.2 v1(38.4,4.7)
  L10 w0.114: v1(17.8,55.8) 18.3,55.3 19,55.3 R153.2@19.7,54.6
SD2_CLK_R: R153.1 U1.C21 | length 2.3
  L1 w0.114: U1.C21@22,54.9 v1(22.4,54.5)
  L10 w0.114: R153.1@20.7,54.6 20.8,54.5 v1(22.4,54.5)
SD2_CMD: J13.3 R143.1 R152.2 | length 70.5
  L1 w0.114: v1(37.8,4.2) 38.815,4.2 39.015,4.4 40,4.4 40.615,5.015 J13.3@40.615,5.775
  L8 w0.12: v1(18.7,53.9) 18.7,53.5 18.4,53.2 18.4,51.8 17.5,50.9 17.5,49.9 16.8,49.2 16.8,48.1 15.9,47.2 15.9,44 15.7,43.8 15.7,42.7 15.2,42.2 15.2,40 15,39.8 15,34.956 17.066,32.89 17.3,32.89 18.515,31.675 18.515,31.441 19.8,30.156 19.8,29.8 24.1,25.5 24.1,23.4 24.4,23.1 24.4,17.456 25,16.856 25,15.1 25.815,14.285 25.815,11.641 26.1,11.356 26.1,10.7 27.4,9.4 27.7,9.4 28.6,8.5 28.856,8.5 32.656,4.7 33.396,4.7 34.086,4.01 37.61,4.01 v1(37.8,4.2)
  L10 w0.114: v1(18.7,53.9) R143.1@18.7,54.6 19.1,54.6 19.2,54.5 19.2,54.2 19.7,53.7 R152.2@19.7,53.4
SD2_CMD_R: R152.1 U1.F19 | length 4.3
  L1 w0.114: v1(24,53.7) U1.F19@24.4,53.3
  L10 w0.114: R152.1@20.7,53.4 21.4,54.1 23.6,54.1 v1(24,53.7)
SD2_DATA0: J13.7 U1.A22 | length 75.2
  L1 w0.114: v1(19.4,55.8) 19.5,55.7 U1.A22@20.4,55.7 ; v1(36.2,4.7) 36.215,4.715 J13.7@36.215,5.775
  L8 w0.12: v1(19.4,55.8) 19,55.4 19,54.8 19.4,54.4 19.4,54 19,53.6 19,51.944 17.915,50.859 17.915,49.7 17.585,49.37 17.585,48.285 16.7,47.4 16.7,46 16.5,45.8 16.5,43.9 16.2,43.6 16.2,42.6 15.705,42.105 15.705,40.805 15.515,40.615 15.515,39.985 15.8,39.7 15.8,39.4 15.41,39.01 15.41,37.58 15.8,37.19 15.8,35.4 16,35.2 16,34.8 18.1,32.7 18.6,32.7 19.3,32 19.3,31.456 20.255,30.501 20.255,30.045 22.565,27.735 23.565,27.735 24.1,27.2 24.1,26.5 25.7,24.9 25.7,24.4 25.5,24.2 25.1,24.2 24.9,24 24.9,22.9 25.15,22.65 25.45,22.65 25.7,22.4 25.7,22 25.2,21.5 25.2,21.1 25.4,20.9 25.8,20.9 26,20.7 26,20.3 25.8,20.1 24.9,20.1 24.7,19.9 24.7,19.5 24.9,19.3 25.9,19.3 26.1,19.1 26.1,18.7 25.9,18.5 24.9,18.5 24.7,18.3 24.7,17.9 24.9,17.7 25.7,17.7 26,17.4 26,15.1 26.3,14.8 26.3,12.244 26.585,11.959 26.585,10.771 27.441,9.915 27.985,9.915 28.9,9 29.444,9 31.585,6.859 31.585,6.415 32.6,5.4 34.4,5.4 34.6,5.2 34.6,4.6 34.8,4.4 35.2,4.4 35.4,4.6 35.4,5.2 35.6,5.4 36,5.4 36.2,5.2 v1(36.2,4.7)
SD2_DATA1: J13.8 U1.E20 | length 75.2
  L1 w0.114: v1(23.2,54.5) U1.E20@23.6,54.1 ; v1(33.8,6.6) 34.6,6.6 35.115,6.085 J13.8@35.115,5.775
  L8 w0.12: v1(23.2,54.5) 23.045,54.5 22.66,54.885 21.66,54.885 20.385,53.61 20.385,50.185 20.1,49.9 19.9,49.9 18.7,48.7 18.7,45.4 17.785,44.485 17.785,41.485 17.2,40.9 17.2,40.3 17.515,39.985 17.515,36.629 18.9,35.244 18.9,34.5 22,31.4 22,30.4 22.4,30 22.4,29.556 22.841,29.115 24.685,29.115 26.2,27.6 26.2,26.844 27.3,25.744 27.3,25.3 26.9,24.9 26.9,24.5 27.2,24.2 28.1,24.2 28.3,24 28.3,23.6 28.1,23.4 27.6,23.4 27.4,23.2 27.4,22.8 27.6,22.6 28.3,22.6 28.5,22.4 28.5,22 28.3,21.8 27.2,21.8 27,21.6 27,21.2 27.2,21 28.3,21 28.5,20.8 28.5,20.4 28.3,20.2 27.6,20.2 27.4,20 27.4,19.6 27.6,19.4 28.3,19.4 28.5,19.2 28.5,18.7 27.425,17.625 27.425,12.183 28.367,11.242 28.858,11.242 29.108,10.992 29.108,10.5 29.308,10.3 29.6,10.3 30.4,11.1 30.7,11.1 31,10.8 31,10.6 30.4,10 30.4,9.7 30.7,9.4 31,9.4 31.8,10.2 32.2,10.2 32.5,9.9 32.5,9.5 32,9 32,8.7 32.3,8.4 32.8,8.4 33.1,8.1 33.1,7.6 33.8,6.9 v1(33.8,6.6)
SD2_DATA2: J13.1 U1.A23 | length 75.2
  L1 w0.114: v1(19.8,56.5) U1.A23@20.4,56.5 ; v1(39.2,3.9) 39.9,3.2 41.6,3.2 42.815,4.415 J13.1@42.815,5.775
  L8 w0.12: v1(19.8,56.5) 19.785,56.485 19.785,55.641 19.615,55.471 19.615,55.141 19.8,54.956 19.8,53.9 19.4,53.5 19.4,51.7 18.744,51.044 18.744,49.944 17.9,49.1 17.9,48.1 17.485,47.685 17.485,46.085 17,45.6 17,43.9 16.7,43.6 16.7,42.544 16.1,41.944 16.1,40.629 16.285,40.444 16.285,39.285 15.7,38.7 15.7,38.3 16.3,37.7 16.3,35.7 16.5,35.5 16.5,34.9 18.2,33.2 18.6,33.2 19.815,31.985 19.959,31.985 20.685,31.259 20.685,30.471 21.4,29.756 21.4,29.4 22.62,28.18 22.626,28.18 22.741,28.065 23.891,28.065 25.1,26.856 25.1,26 26.035,25.065 26.035,21.165 26.5,20.7 26.5,15.7 26.673,15.527 ; 26.673,12.267 26.865,12.075 26.865,11.579 29.044,9.4 29.6,9.4 31.4,7.6 31.9,7.6 32.385,7.115 32.385,6.471 33.056,5.8 37.9,5.8 39.2,4.5 v1(39.2,3.9) ; 26.675,12.267 26.675,15.527
SD2_DATA3: J13.2 U1.B22 | length 75.2
  L1 w0.114: v1(20.8,55.3) U1.B22@21.2,55.7 ; v1(40,3.9) 40.2,3.7 41.4,3.7 41.8,4.1 41.8,4.644 41.615,4.829 41.615,6.075 J13.2@41.715,6.175
  L8 w0.12: v1(20.8,55.3) 20.8,54.9 20.2,54.3 20.2,53.821 19.8,53.421 19.8,50.9 19.615,50.715 19.615,50.2 18.3,48.885 18.3,47.9 17.8,47.4 17.8,46.7 18.3,46.2 18.3,45.8 17.4,44.9 17.4,42.9 17,42.5 17,41.5 16.8,41.3 16.8,39.1 17.1,38.8 17.1,37.9 16.7,37.5 16.7,36.1 17.3,35.5 17.3,34.7 17.6,34.4 18.4,34.4 18.7,34.1 18.7,33.6 19.4,32.9 20.044,32.9 20.5,32.444 20.5,32.1 21,31.6 21,30.8 21.9,29.9 21.9,29.4 22.465,28.835 23.121,28.835 23.4,28.556 23.9,28.556 24.556,27.9 25.3,27.9 25.7,27.5 25.7,26.056 26,25.756 26.444,25.756 26.659,25.541 26.659,25.159 26.5,25 26.5,24.4 26.8,24.1 26.8,23.6 26.5,23.3 26.5,22.9 26.9,22.5 26.9,22.2 26.45,21.75 26.45,21.35 27.05,20.75 27.05,12.286 ; v1(40,3.9) 40,4.4 38.185,6.215 33.441,6.215 33.185,6.471 33.185,7.015 32.2,8 31.6,8 31.4,8.2 31.4,8.8 31.172,9.028 30.628,9.028 29.726,9.93 29.07,9.93 27.145,11.855 27.145,12.191 ; 27.05,12.286 27.145,12.191 ; 27.05,12.286 27.145,12.191
SD2_WP: R139.2 R151.1 U1.T1 | length 4.2
  L1 w0.114: U1.T1@32.4,38.9 32.5,38.9 34.3,37.1 R151.1@34.3,37 34.3,36.5 34,36.2 R139.2@34,35.7
SENSE_1V5: R302.1 R303.2 U31.5 | length 3.5
  L10 w0.3: R302.1@1.4,43.5 2.3,44.4 R303.2@2.3,44.6 2.6,44.6 3.6,43.6 U31.5@3.6,43.25
SPLIT: C313.1 R246.1 R248.2 R249.2 | length 3.1
  L10 w0.4: v1(2.9,47.3) 3.3,46.9 R246.1@3.3,46.7 ; v1(5.75,46.1) 6.3,46.65 R249.2@6.3,46.7 ; C313.1@7.4,46.8 7.4,47 v1(7.1,47.3) 7.4,47.6 R248.2@7.4,48.1
SPLIT_R: R248.1 U19.5
SS_1V375: R342.2 U30.7 | length 1.6
  L1 w0.4: v1(12,33.05) 12.05,33 R342.2@12.7,33
  L10 w0.23: v1(12,33.05) 12.2,33.25 U30.7@12.79,33.25
SS_3V3_HDR: R406.2 U36.7 | length 1.1
  L10 w0.23: R406.2@11.4,90.5 11.45,90.45 U36.7@12.49,90.45
STBY_OR_USER_LED_3: D36.1 R391.1 U6.7 | length 6.4
  L10 w0.114: U6.7@21.95,18.875 22.525,18.875 22.8,18.6 22.8,17.66 21.915,16.775 21.915,16.044 22.67,15.289 22.67,14.37 R391.1@22.3,14
SW1CFB: R384.2 U9.13 | length 1.6
  L1 w0.3: v1(24.7,30.9) 24.85,30.75 U9.13@24.85,30.15
  L10 w0.4: R384.2@24.6,31.6 24.6,31 v1(24.7,30.9)
SW1CLX: L8.2 U9.11
SW1LX: L1.1 U9.8 U9.9
SW2LX: L10.1 U9.22
SW3LX: L2.1 U9.35 U9.36
SW4LX: L9.1 U9.21
SW_EP: U32.3 U32.4 U32.5 U32.6 U32.14
SWBSTLX: D18.2 L11.2 U9.46
SYNC_1V375: R335.1 R338.2 U30.4 | length 11.4
  L10 w0.114: R335.1@5.7,27.5 5.8,27.6 R338.2@6.8,27.6 6.8,27.4 7.62,26.58 7.98,26.58 8.9,27.5 10.36,27.5 11.16,28.3 11.16,29.96 11.915,30.715 12.515,30.715 13.4,31.6 U30.4@13.45,31.6
SYNC_3V3_HDR: R398.1 R401.2 U36.4 | length 2.7
  L10 w0.114: U36.4@13.15,88.8 13.15,88.35 13.7,87.8 R398.1@13.7,87.5 R401.2@13.7,86.3
TAMPER: R55.1 U1.E11 | length 1.2
  L1 w0.114: v1(23.2,47.3) U1.E11@23.6,46.9
  L10 w0.114: v1(23.2,47.3) 23.4,47.1 R55.1@23.735,47.1
TCT0: C272.2 J6.12 | length 1.7
  L10 w0.4: J6.12@22.296,74.213 22.7,73.809 C272.2@22.7,72.7
TCT1: C274.2 J6.6 | length 1.6
  L10 w0.4: J6.6@21.28,76.753 J6.6@21.327,76.8 ; J6.6@21.28,77.053 22.753,77.053 C274.2@22.8,77.1
TCT2: C275.2 J6.1 | length 2.6
  L10 w0.4: C275.2@9.2,78.5 9.242,78.5 9.625,78.117 J6.1@10.689,77.053 ; J6.1@10.647,77.053 J6.1@10.689,77.053 ; J6.1@11.12,77.053 J6.1@10.689,77.053
TCT3: C276.2 J6.7 | length 1.8
  L10 w0.4: C276.2@10.104,72.7 J6.7@10.104,74.513
TEMP_ADD0: R258.2 R259.2 U24.5 | length 7.3
  L1 w0.114: v1(26.7,92.5) 26.4,92.2 R259.2@25.9,92.2 25.285,91.585 25.285,89.571 26.8,88.056 U24.5@26.8,87.75
  L10 w0.114: v1(26.7,92.5) 27.4,91.8 R258.2@27.5,91.8
TEMP_ALERT: R257.1 U1.E24 U24.3 | length 44.6
  L1 w0.114: v1(22.8,59.5) 22.8,59.244 23.185,58.859 23.185,58.855 23.21,58.83 23.21,57.69 U1.E24@23.6,57.3 ; v1(26.7,88.7) 26.656,88.7 25.85,89.506 25.85,91.008 26.622,91.78 26.98,91.78 R257.1@27.4,92.2
  L3 w0.12: v1(22.8,59.5) 23.185,59.885 23.729,59.885 24,60.156 24,65.056 28.02,69.076 28.02,69.864 28.641,70.485 29.185,70.485 31,72.3 32.5,72.3 32.8,72.6 32.8,73.8 32.285,74.315 32.285,76.215 31,77.5 31,78.8 29.9,79.9 v1(29.9,82.3)
  L10 w0.114: v1(26.7,88.7) 26.7,86.3 28.1,84.9 28.1,84.1 v1(29.9,82.3)
TEST_MODE: R56.2 U1.E12 | length 3.7
  L1 w0.114: v1(22.4,48.1) 23,48.1 23.4,47.7 U1.E12@23.6,47.7
  L10 w0.114: v1(22.4,48.1) 22.8,47.7 22.8,46.135 R56.2@22.665,46
TRD0_N: J6.10 U7.3 | length 9.3
  L1 w0.1: U7.3@17.35,70.54 17.35,70.94 17.44,71.03 17.44,71.26 17.2,71.5 17.2,72.544 17.617,72.961 18.383,72.961 18.8,72.544 18.8,72.009 19.159,71.65 19.5,71.65 19.74,71.89 19.74,72.26 v1(19.6,72.4)
  L10 w0.1: J6.10@18.232,74.513 18.475,74.513 19.088,73.9 19.088,73.559 19.74,72.907 19.74,72.54 v1(19.6,72.4)
TRD0_P: J6.11 U7.2 | length 9.3
  L1 w0.1: U7.2@17.85,70.54 17.85,70.94 17.76,71.03 17.76,71.393 17.52,71.633 17.52,72.412 17.75,72.641 18.25,72.641 18.48,72.412 18.48,71.877 19.027,71.33 19.633,71.33 20.06,71.757 20.06,72.26 v1(20.2,72.4)
  L10 w0.1: v1(20.2,72.4) 20.06,72.54 20.06,73.04 19.408,73.692 19.408,73.9 20.021,74.513 J6.11@20.264,74.513
TRD1_N: J6.5 U7.6 | length 9.3
  L1 w0.1: U7.6@15.85,70.54 15.85,70.95 16.03,71.13 16.03,73.483 16.48,73.933 16.48,75.1 16.18,75.4 v1(16.1,75.4)
  L10 w0.1: v1(16.1,75.4) 16.172,75.4 16.372,75.2 17.409,75.2 19.248,77.039 J6.5@19.248,77.053
TRD1_P: J6.4 U7.5 | length 9.3
  L1 w0.1: U7.5@16.35,70.54 16.35,73.35 16.8,73.8 16.8,75.5 v1(16.5,75.8)
  L10 w0.1: v1(16.5,75.8) 16.5,75.72 16.7,75.52 17.277,75.52 18.22,76.463 18.22,76.88 18.047,77.053 J6.4@17.216,77.053
TRD2_N: J6.2 U7.8 | length 9.3
  L1 w0.1: v1(14.8,72.88) 14.94,72.74 14.94,72.54 14.48,72.08 14.48,71.6 14.94,71.14 14.94,71.03 14.85,70.94 U7.8@14.85,70.54
  L10 w0.1: J6.2@13.152,77.053 13.655,77.053 14.008,76.7 14.008,75.858 14.421,75.445 14.987,75.445 15.84,74.592 15.84,74.249 15.642,74.051 15.351,74.051 14.94,73.64 14.94,73.02 v1(14.8,72.88)
TRD2_P: J6.3 U7.7 | length 9.3
  L1 w0.1: U7.7@15.35,70.54 15.35,70.94 15.26,71.03 15.26,71.273 14.8,71.733 14.8,71.947 15.26,72.407 15.26,72.74 v1(15.4,72.88)
  L10 w0.1: J6.3@15.184,77.053 14.681,77.053 14.328,76.7 14.328,75.99 14.553,75.765 15.12,75.765 16.16,74.725 16.16,74.117 15.774,73.731 15.483,73.731 15.26,73.507 15.26,73.02 v1(15.4,72.88)
TRD3_N: J6.9 U7.11 | length 9.3
  L1 w0.1: v1(11.1,72.5) 11.2,72.5 11.48,72.78 11.72,72.78 12.12,72.38 12.38,72.38 12.78,72.78 12.977,72.78 13.53,72.227 13.53,71.1 13.35,70.92 U7.11@13.35,70.54
  L10 w0.1: v1(11.1,72.5) 13.1,72.5 13.5,72.9 13.5,73.845 J6.9@14.168,74.513
TRD3_P: J6.8 U7.10 | length 9.3
  L1 w0.1: v1(11.1,73.1) 13.109,73.1 13.85,72.359 U7.10@13.85,70.54
  L10 w0.1: v1(11.1,73.1) 11.2,73.1 11.48,72.82 12.967,72.82 13.18,73.033 13.18,73.9 12.567,74.513 J6.8@12.136,74.513
TS_X+: C177.1 D37.5 FB15.2 J10.1 | length 11.7
  L10 w0.3: J10.1@5.15,11.125 5.7,10.575 5.7,9.3 6.2,8.8 8.1,8.8 8.36,9.06 8.36,10.94 8.15,11.15 D37.5@8.15,11.7 8.16,11.69 8.71,11.69 C177.1@9.2,11.2 9.5,11.2 10.31,10.39 10.31,9.31 FB15.2@10.2,9.2
TS_X+_B: FB15.1 R393.2 U6.21 | length 19.2
  L8 w0.3: v1(9.9,8.2) 9.2,8.9 9.2,13.2 11.7,15.7 12.9,15.7 13.8,16.6 13.8,20.45 v1(13.5,20.75)
  L10 w0.3: FB15.1@9.2,9.2 9.1,9.1 R393.2@9.1,8.2 v1(9.9,8.2) ; v1(13.5,20.75) 14.6,20.75 14.675,20.825 U6.21@15.25,20.825
TS_X-: C178.1 D37.1 FB25.2 J10.2 | length 3.9
  L10 w0.3: J10.2@5.15,12.375 5.521,12.375 6.234,11.662 D37.1@6.65,11.662 6.7,11.612 C178.1@6.7,10.6 FB25.2@7.7,10.6
TS_X-_B: FB25.1 R394.2 U6.22 | length 18.7
  L8 w0.3: v1(7.2,10.1) 7.2,10.9 6.5,11.6 6.5,14.428 7.3,15.228 7.3,17.8 9.1,19.6 v1(10.9,19.6)
  L10 w0.3: v1(7.2,10.1) FB25.1@7.7,9.6 ; v1(10.9,19.6) 10.9,19.728 11.6,20.428 R394.2@11.6,20.6 12.265,21.265 14.464,21.265 14.484,21.285 14.509,21.285 14.699,21.475 U6.22@15.25,21.475
TS_Y+: C210.1 D37.4 FB28.2 J10.4 | length 11.1
  L10 w0.3: J10.4@5.15,14.875 6.15,15.875 7.725,15.875 8.6,15 8.6,14 8.2,13.6 D37.4@8.2,12.71 ; D37.4@8.2,12.7 D37.4@8.15,12.7 8.15,12.71 D37.4@8.2,12.71 ; FB28.2@11.6,14.8 10.728,14.8 9.2,13.272 C210.1@9.2,13.2 8.71,12.71 D37.4@8.2,12.71
TS_Y+_B: FB28.1 R396.2 U6.24 | length 11.9
  L8 w0.3: v1(10.8,16.6) 11.6,16.6 12.3,17.3 12.3,18.072 12.603,18.375 12.947,18.375 13.275,18.703 13.275,20.097 12.8,20.572 12.8,21.9 v1(13.1,22.2)
  L10 w0.3: v1(10.8,16.6) 11,16.8 R396.2@11.6,16.8 FB28.1@11.6,15.8 ; v1@13.1,22.205 14.128,22.205 14.128,22.207 14.697,22.775 U6.24@15.25,22.775
TS_Y-: C179.1 D37.3 FB27.2 J10.3 | length 4
  L10 w0.3: J10.3@5.15,13.625 5.575,13.625 6.462,12.738 D37.3@6.65,12.738 6.65,13.75 C179.1@6.7,13.8 7.6,13.8 FB27.2@7.7,13.7
TS_Y-_B: FB27.1 R395.2 U6.23 | length 15.9
  L8 w0.3: v1(7.2,14.3) 8.2,15.3 8.2,16.3 9.1,17.2 11,17.2 11.5,17.7 11.5,18.8 12.2,19.5 12.2,20 v1(11,21.2)
  L10 w0.3: v1(7.2,14.3) FB27.1@7.7,14.8 ; v1(11,21.2) 11.5,21.7 R395.2@11.6,21.7 11.625,21.725 14.274,21.725 14.294,21.745 14.319,21.745 14.699,22.125 U6.23@15.25,22.125
UART1_CTS: Q8.4 R60.1 R375.1 U1.G21 | length 66.5
  L1 w0.114: U1.G21@25.2,54.9 25.6,55.3 v1(26.4,55.3)
  L3 w0.12: v1(26.4,55.3) 26,55.7 26,57.1 25.4,57.7 25.4,65.2 29.2,69 29.2,69.444 31.456,71.7 33,71.7 33.615,72.315 33.615,78.285 v1(33.4,78.5) ; v1(33.956,88.8) 35.156,90 39.5,90 39.9,90.4 46.8,90.4 48.3,91.9 49.6,91.9 50.2,92.5 v1(54.4,92.5)
  L10 w0.114: v1(33.4,78.5) 33.8,78.9 33.8,81.9 32.9,82.8 32.9,86.8 33.956,87.856 v1(33.956,88.8) ; R60.1@51.7,93.7 R375.1@52.7,93.7 52.7,92.8 53.15,92.35 Q8.4@53.65,92.35 54.25,92.35 v1(54.4,92.5)
UART1_CTS_FTDI: D31.1 J3.6 Q8.3 R60.2 | length 39.3
  L8 w0.12: v1(49.95,93.7) 51.4,93.7 54.1,91 55.4,91 55.8,90.6 57.5,90.6 59.5,88.6 62.1,88.6 63.5,87.2 64.06,87.2 65,86.26 65,85.8 65.5,85.3 65.5,83.7 66.2,83 66.2,75.5 66.4,75.3 66.4,72.7 v1(66.9,72.2)
  L10 w0.114: v1(49.95,93.7) R60.2@50.7,93.7 50.7,93.2 51.55,92.35 Q8.3@51.75,92.35 ; v1(66.9,72.2) 66,73.1 D31.1@66,73.15 66.05,73.15 66.7,73.8 67.84,73.8 J3.6@68.04,73.6
UART1_RTS: Q11.1 R376.1 R378.1 U1.G20 | length 69.1
  L1 w0.114: U1.G20@25.2,54.1 v1(25.6,53.7)
  L3 w0.12: 25.6,54.64 v1(25.6,53.7) 25.6,56.7 24.8,57.5 24.8,65.2 28.4,68.8 28.4,69.444 28.656,69.7 28.944,69.7 31.264,72.02 32.82,72.02 33.2,72.4 33.2,78 33,78.2 33,78.9 v1(33.4,79.3) ; v1(33.1,87.9) 35.4,87.9 36.6,89.1 50.8,89.1 52.75,91.05 v1(55.9,91.05)
  L10 w0.114: v1(33.1,87.9) 32,86.8 32,83 33.4,81.6 v1(33.4,79.3) ; R376.1@55.9,89.8 R378.1@56.9,89.8 56.9,90.9 56.75,91.05 Q11.1@56.65,91.05 v1(55.9,91.05)
UART1_RTS_FTDI: D32.1 J3.2 Q11.6 R377.1 R378.2 | length 16.1
  L8 w0.12: v1(59.3,90.9) 60.4,90.9 61.2,90.1 62.1,90.1 v1(64.6,87.6)
  L10 w0.114: R377.1@59.2,89.8 R378.2@57.9,89.8 57.9,90.6 58.35,91.05 Q11.6@58.55,91.05 59.15,91.05 v1(59.3,90.9) ; v1(64.6,87.6) 65.25,87.6 D32.1@66.15,86.7 66.77,86.08 66.77,85.474 68.04,84.204 J3.2@68.04,83.76
UART1_RXD: Q8.1 R370.1 R373.1 U1.M3 | length 85.2
  L1 w0.114: v1(26.9,37.4) 27.356,37.4 27.856,37.9 28.2,37.9 28.8,38.5 28.8,40.1 U1.M3@29.2,40.5
  L3 w0.12: v1(26.9,37.4) 27.3,37.8 27.3,38.7 26.795,39.205 26.795,40.249 26.544,40.5 26.215,40.5 26.015,40.7 26.015,43.459 26.241,43.685 26.529,43.685 27.359,44.515 28.159,44.515 28.41,44.766 28.41,53.834 28.159,54.085 27.871,54.085 27.585,54.371 27.585,56.315 27.4,56.5 27.056,56.5 26.8,56.756 26.8,58 27.2,58.4 27.2,59.61 27.8,60.21 27.8,66.2 28.9,67.3 29.2,67.3 29.5,67.6 29.5,68.8 29.7,69 29.7,69.4 30.8,70.5 31.356,70.5 32.216,71.36 33.56,71.36 34.1,71.9 34.1,74.5 34.5,74.9 34.5,76.5 34.2,76.8 34.2,78.1 v1(34.7,78.6) ; v1(36.5,88.3) 36.7,88.5 46.7,88.5 46.915,88.285 51.385,88.285 v1(52.2,89.1)
  L10 w0.114: v1(34.7,78.6) 34.7,83.1 33.9,83.9 33.9,85.7 35.3,87.1 v1(36.5,88.3) ; R370.1@50.3,91.6 51,91.6 51.55,91.05 Q8.1@51.75,91.05 51.75,90.25 R373.1@52.2,89.8 v1(52.2,89.1)
UART1_RXD_FTDI: D4.1 J3.4 Q8.6 R373.2 | length 27.6
  L8 w0.12: v1(54.3,89.7) 54.7,90.1 57.3,90.1 59.4,88 62.144,88 64.82,85.324 64.82,83.92 64.385,83.485 63.485,83.485 v1(62.2,82.2)
  L10 w0.114: Q8.6@53.65,91.05 53.65,90.65 53.2,90.2 R373.2@53.2,89.8 53.3,89.7 v1(54.3,89.7) ; v1(62.2,82.2) 63.75,80.65 D4.1@66,80.65 66.65,80.65 68.04,79.26 J3.4@68.04,78.7
UART1_TXD: Q11.4 R371.1 R374.1 U1.M1 | length 91.5
  L1 w0.114: v1(28.1,37.4) 28.2,37.4 29.135,38.335 29.135,38.835 U1.M1@29.2,38.9
  L3 w0.12: v1(28.1,37.4) 27.6,37.9 27.6,38.82 27.085,39.335 27.085,40.37 26.8,40.655 26.8,43.444 27.071,43.715 28.315,43.715 29.215,44.615 29.215,53.425 28.4,54.24 28.4,56.3 28.185,56.515 27.841,56.515 27.615,56.741 27.615,56.785 27.6,56.8 27.6,58.9 28.2,59.5 28.2,65.7 28.9,66.4 29.244,66.4 29.9,67.056 29.9,68.656 30.144,68.9 30.144,69.289 31.056,70.2 31.6,70.2 32.4,71 33.8,71 34.5,71.7 34.5,74.1 35,74.6 35,77.5 v1(34.7,77.8) ; v1(35,88.3) 36.3,89.6 39.8,89.6 40.1,89.9 47.4,89.9 48.9,91.4 50.3,91.4 51,92.1 58.9,92.1 v1(59.3,92.5)
  L10 w0.114: v1(34.7,77.8) 34.2,78.3 34.2,82.2 33.335,83.065 33.335,85.835 35,87.5 v1(35,88.3) ; R374.1@56.8,93.7 R371.1@57.8,93.7 57.8,92.9 58.35,92.35 Q11.4@58.55,92.35 59.15,92.35 v1(59.3,92.5)
UART1_TXD_FTDI: D8.1 J3.5 Q11.3 R372.1 R374.2 | length 29.2
  L8 w0.12: v1(57.4,92.5) 58.4,91.5 58.4,91 59.9,89.5 61.9,89.5 63.7,87.7 63.956,87.7 64.556,87.1 65.2,87.1 66.2,86.1 66.2,84 66.8,83.4 66.8,80.5 67.1,80.2 67.1,79.318 66.6,78.818 v1(66.6,77.1)
  L10 w0.114: R372.1@55.1,92.1 55.1,93.5 55.3,93.7 R374.2@55.8,93.7 55.8,93.3 56.65,92.45 Q11.3@56.65,92.35 57.25,92.35 v1(57.4,92.5) ; v1(66.6,77.1) 66,76.5 D8.1@66,76.25 66.11,76.14 J3.5@68.04,76.14